# Altium PCB Story_machine V1.31.PcbDoc
Units mm, origin at the board's own origin, x right, y up, seen from the top; angles counter-clockwise.
Board outline 75 x 43 mm, 2 copper layers (Top Layer, Bottom Layer); 52 components, 47 nets, 209 pads, 177 vias.
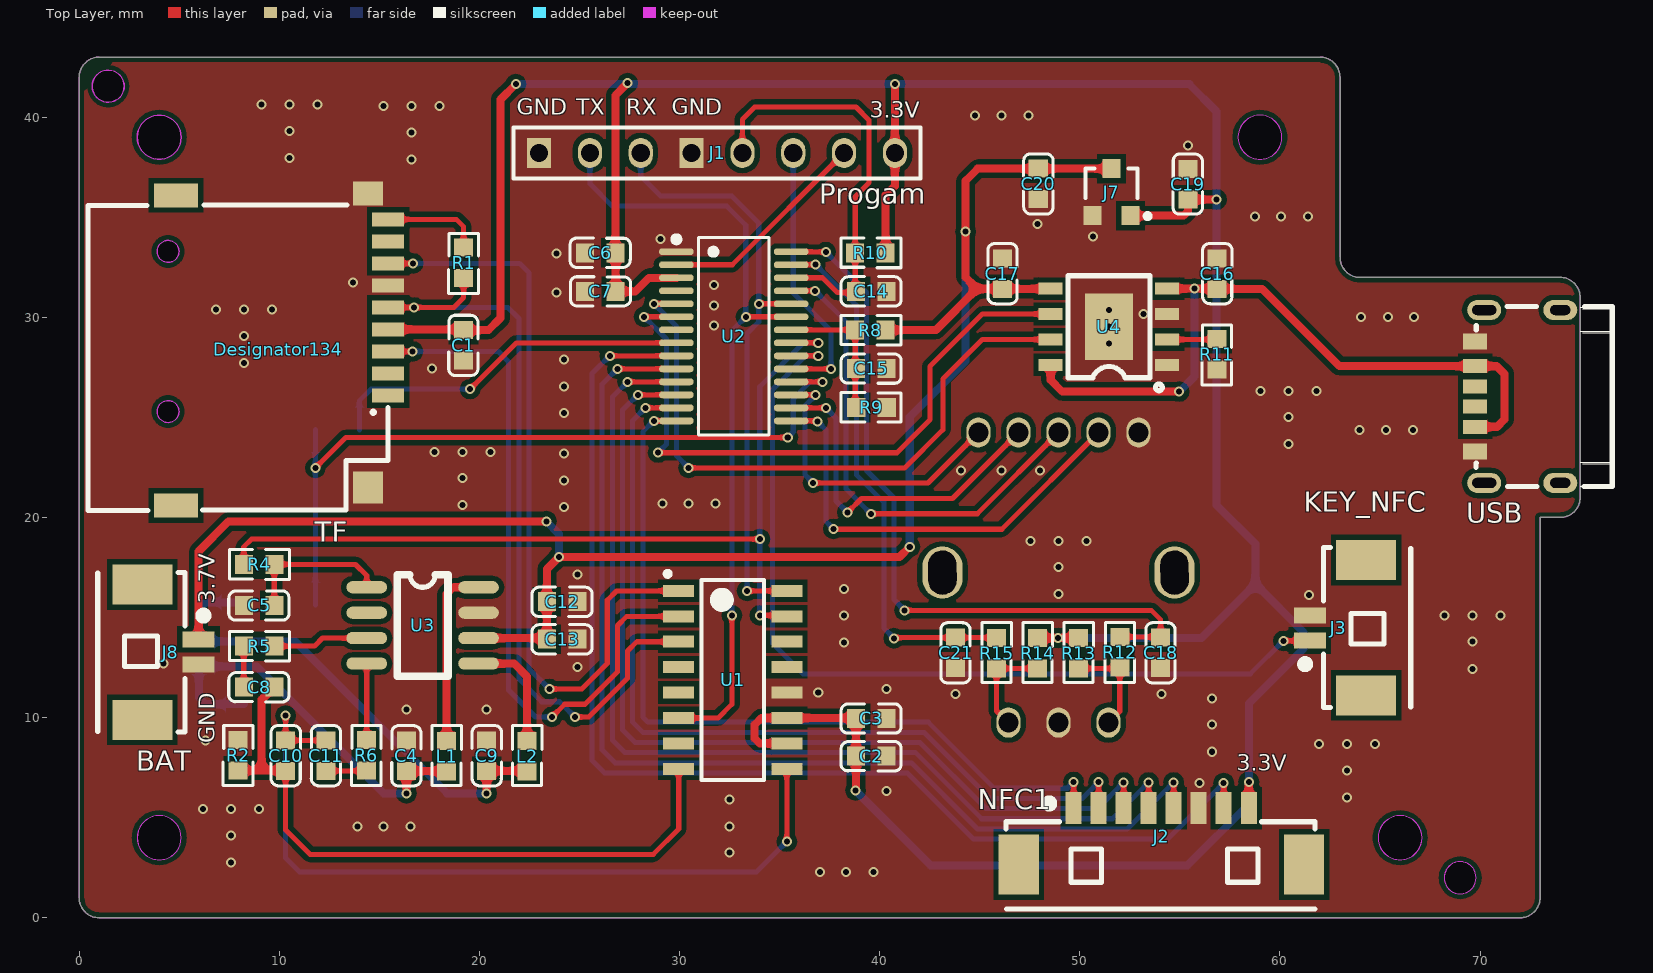
[diagram p0: Top Layer view]
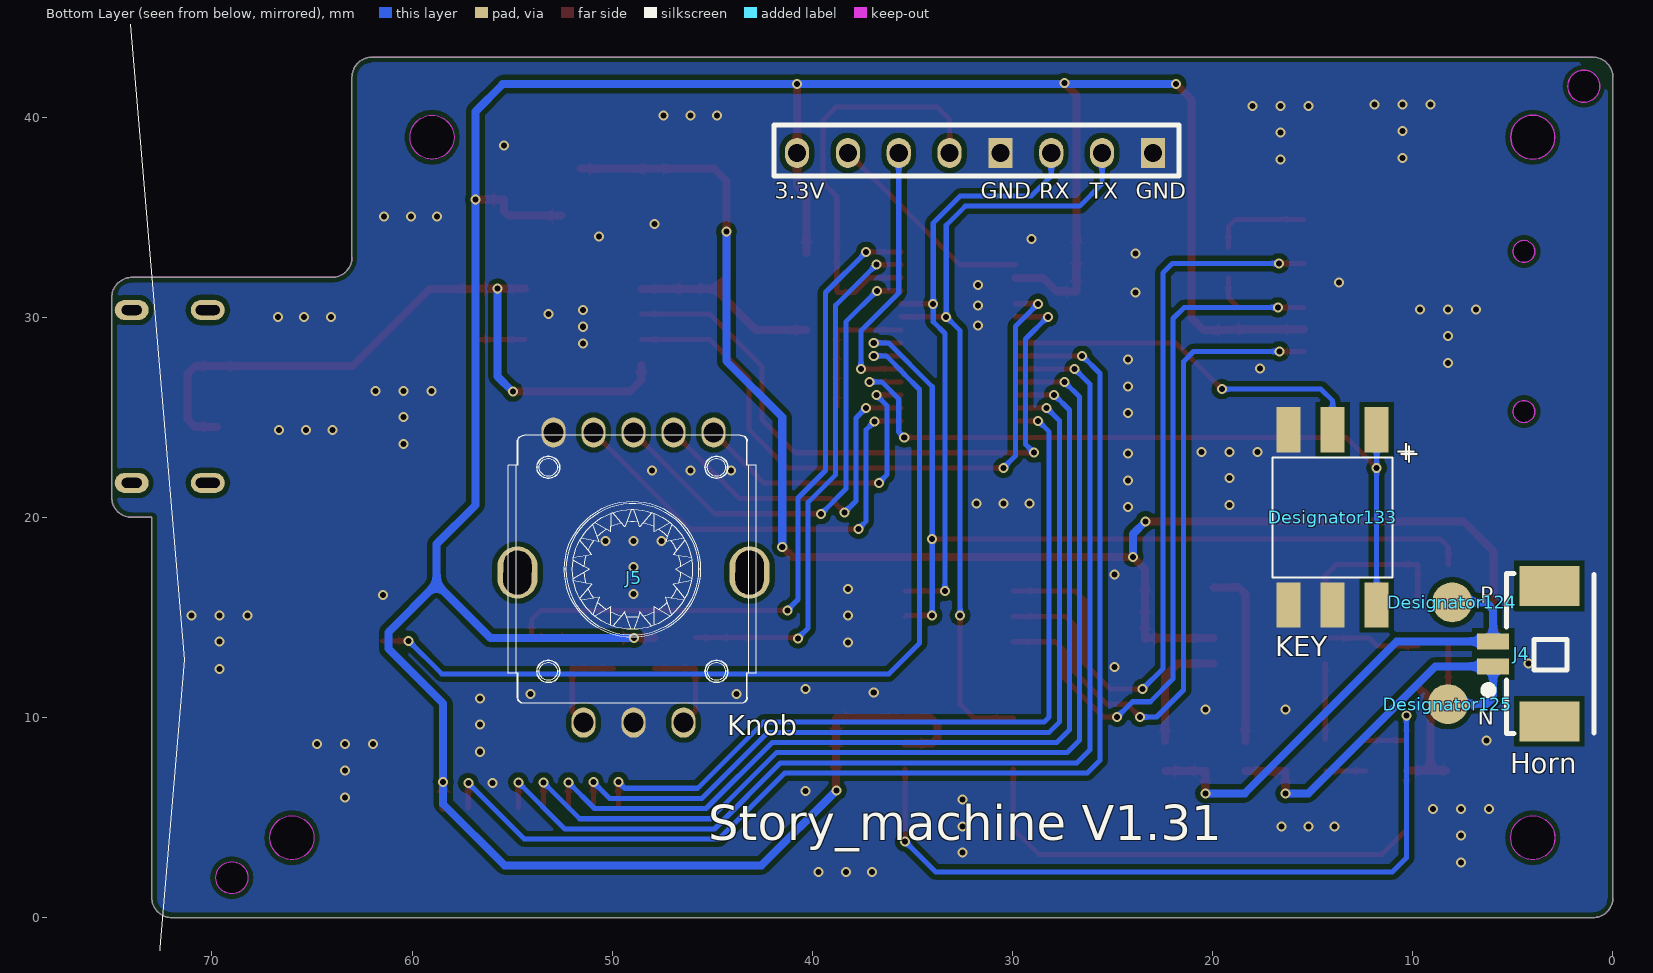
[diagram p1: Bottom Layer view, seen from below]
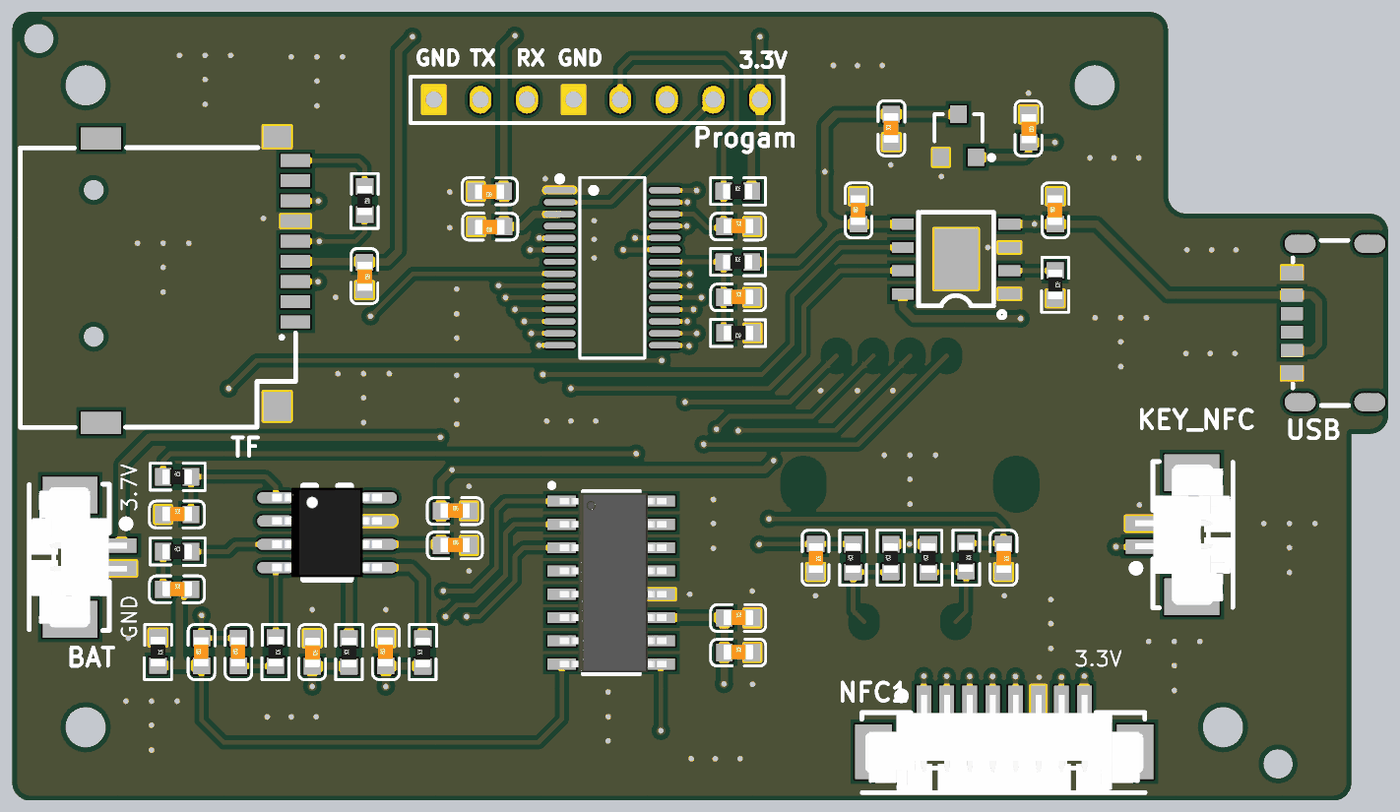
[diagram p2: 3D render of the assembled board from above, using the file's embedded part models]

## Layer stack, top to bottom
Top Solder: solder mask 0.0102, Solder Resist, Dk 3.5
Top Layer: signal copper 0.0356
Dielectric 1: dielectric 0.32, FR-4, Dk 4.8
Bottom Layer: signal copper 0.0356
Bottom Solder: solder mask 0.0102, Solder Resist, Dk 3.5

## Board outline
0,1 0,42 cw(c1,42) 1,43 62,43 cw(c62,42) 63,42 63,33 ccw(c64,33) 64,32 74,32 cw(c74,31) 75,31 75,21 cw(c74,21) 74,20 73,20 73,1 cw(c72,1) 72,0 1,0 cw(c1,1)
cut-out: 4.441,24.744 cw(c4.441,25.294) 3.891,25.294 cw(c4.441,25.294) 4.441,25.844 cw(c4.441,25.294) 4.991,25.294 cw(c4.441,25.294)
cut-out: 4.441,32.745 cw(c4.441,33.295) 3.891,33.295 cw(c4.441,33.295) 4.441,33.845 cw(c4.441,33.295) 4.991,33.295 cw(c4.441,33.295)
cut-out: 1.45,40.75 cw(c1.45,41.55) 0.65,41.55 cw(c1.45,41.55) 1.45,42.35 cw(c1.45,41.55) 2.25,41.55 cw(c1.45,41.55)
cut-out: 4,37.9 cw(c4,39) 2.9,39 cw(c4,39) 4,40.1 cw(c4,39) 5.1,39 cw(c4,39)
cut-out: 2.9,4 ccw(c4,4) 4,2.9 ccw(c4,4) 5.1,4 ccw(c4,4) 4,5.1 ccw(c4,4)
cut-out: 68.2,2 ccw(c69,2) 69,1.2 ccw(c69,2) 69.8,2 ccw(c69,2) 69,2.8 ccw(c69,2)
cut-out: 64.9,4 ccw(c66,4) 66,2.9 ccw(c66,4) 67.1,4 ccw(c66,4) 66,5.1 ccw(c66,4)
cut-out: 57.9,39 ccw(c59,39) 59,37.9 ccw(c59,39) 60.1,39 ccw(c59,39) 59,40.1 ccw(c59,39)

## Design rules (kind name [scope] priority, off if disabled: settings)
Clearance [All] p1: gap=0.254 ignorepadtopadclearanceinfootprint=FALSE except(0: Arc-Hole Track-Hole SMDPad-Hole THPad-Hole Via-Hole Fill-Hole Poly-Hole Region-Hole Text-Hole)
PolygonConnect [All] p1: connectstyle=Direct reliefconductorwidth=0.254 reliefentries=4 polygonreliefangle="90 Angle" airgapwidth=0.254
RoutingVias [All] p1: holewidth=0.711 width=1.27 viastyle="Through Hole" minholewidth=0.711 minwidth=1.27 maxholewidth=0.711 maxwidth=1.27
SolderMaskExpansion [All] p1: expansion=0.102
Width [All] p1: maxlimit=0.254 minlimit=0.254 preferedwidth=0.254
30 further rules are at their usual default settings.

## Classes and differential pairs
component class "Story_machine V1.0": C1 C3 C4 C5 C6 C7 C8 C9 C11 C12 C13 C14 C15 C16 C17 C18 C21 J1 J2 J3 J5 J8 KEY L1 L2 R1 R2 R4 R5 R6 R8 R9 R10 R11 R12 R13 R14 R15 SPK1 U1 U2 U3 U4 USB

## Components (designator, comment, footprint, x,y, rotation, side; value= is the part's Value field where it differs from the comment)
C1 "105" C-0603 19.203,28.595 r270 top value=106
C2 "106" C-0603 39.577,8.076 r0 top (schematic designator C3)
C3 "104" C-0603 39.577,9.96 r0 top
C4 "102" C-0603 16.355,8.088 r270 top
C5 "104" C-0603 8.986,15.607 r0 top
C6 "106" C-0603 26.026,33.221 r180 top
C7 "104" C-0603 26.044,31.292 r180 top
C8 "104" C-0603 8.986,11.525 r0 top
C9 "102" C-0603 20.362,8.103 r90 top
C10 "103" C-0603 10.316,8.103 r90 top (schematic designator C11)
C11 "104" C-0603 12.325,8.103 r90 top
C12 "106" C-0603 24.132,15.791 r0 top
C13 "104" C-0603 24.132,13.916 r0 top
C14 "106" C-0603 39.577,31.303 r0 top
C15 "104" C-0603 39.577,27.445 r0 top
C16 "106" C-0603 56.861,32.189 r90 top
C17 "106" C-0603 46.129,32.189 r90 top
C18 "104" C-0603 54.037,13.231 r270 top
C19 "105" C-0603 55.397,36.65 r270 top
C20 "105" C-0603 47.922,36.666 r90 top
C21 "104" C-0603 43.791,13.231 r270 top
Designator124 "Comment" TEXT_pro 10.242,20.976 r180 bottom
Designator125 "Comment" TEXT_pro 10.455,15.884 r180 bottom
Designator133 "KEY" key_LED 18.463,26.026 r270 bottom locked
Designator134 "Comment" TF-SMD_TF-PUSH 10.139,28.346 r270 top locked
J1 "Program" J8 31.396,34.695 r0 top
J2 "NFC1" "MX 1.25-WS-8P" 54.078,2.663 r0 top
J3 "KEY_NFC" "MX 1.25-WS-2P" 64.304,14.495 r90 top
J4 "Horn" "MX 1.25-WS-2P" 3.17,13.196 r90 bottom
J5 "Knob" KnoB_RGB 385.82,-257.576 r180 bottom locked
J7 "HL5933XR" SOT-23R 51.579,36.126 r0 top
J8 "BAT" "MX 1.25-WS-2P" 3.155,13.272 r270 top
L1 "80R" R-0603 18.361,8.076 r90 top
L2 "80R" R-0603 22.38,8.076 r90 top
R1 "1.5K" R-0603 19.21,32.721 r270 top
R2 "0" R-0603 7.944,8.126 r270 top
R4 "10K" R-0603 8.986,17.656 r0 top
R5 "1K" R-0603 8.986,13.573 r0 top
R6 "1K" R-0603 14.353,8.126 r270 top
R8 "100K" R-0603 39.539,29.365 r0 top
R9 "100K" R-0603 39.589,25.497 r180 top
R10 "10K" R-0603 39.539,33.224 r0 top
R11 "1.2K" R-0603 56.85,28.148 r270 top
R12 "10K" R-0603 51.995,13.27 r270 top
R13 "10K" R-0603 49.936,13.219 r90 top
R14 "10K" R-0603 47.887,13.219 r90 top
R15 "10K" R-0603 45.838,13.219 r90 top
U1 "WT2003H-16S*" SOP-16-1.27-6 32.657,11.886 r0 top locked
U2 "MS51EC0AE" MS51EC0AE 32.387,28.718 r270 top locked
U3 "WT8302" SOP-8-1.27-6 17.162,14.608 r0 top
U4 "TP4056" ESOP-8_L4.9-W3.9-P1.27-LS6.0-BL-EP 51.45,29.53 r90 top
USB "TYPE-C 6P" TYPE-C-SMD_TYPE-C-6P-073 74.039,26.427 r90 top (schematic designator USB1)

## Footprints (in the part's own frame and the unit in brackets; to place one, negate y for a bottom-side part, rotate by r counter-clockwise, add the part's x,y. Pads: shape width x height; smd on the part's side, far side on the other; paste and mask are expansions set on the pad)
C-0603 [mm] "元件 长X宽=60X30mil"
  rect 0.9x0.95 smd: 1(-0.762,0) 2(0.762,0)
  silkscreen extent -1.51,-0.74 1.5,0.73, body extent -0.79,-0.38 0.81,0.42, height 0.3
ESOP-8_L4.9-W3.9-P1.27-LS6.0-BL-EP [mm]
  rect 0.6x1.2 smd: 1(-1.905,-2.908) 2(-0.635,-2.908) 3(0.635,-2.908) 4(1.905,-2.908) 5(1.905,2.908) 6(0.635,2.908) 7(-0.635,2.908) 8(-1.905,2.908)
  rect 3.3x2.4 smd: 9(0,0)
  silkscreen extent -3.2,-2.67 2.55,2.05
J8 [mm]
  oval 1.2x1.5 hole 0.9: 1(9.364,3.522) 2(6.824,3.522) 3(4.284,3.522) 4(1.744,3.522) 6(-3.336,3.522) 7(-5.876,3.522)
  rect 1.2x1.5 hole 0.9: 5(-0.796,3.522) 8(-8.416,3.522)
  silkscreen extent -9.69,2.25 10.63,4.79
key_LED [mm] "带灯按键"
  rect 2.25x1.2 smd paste-100 mask+0.051: 1(1.643,6.664) 2(10.393,6.664) 3(1.643,4.464) 4(10.393,4.464) 5(1.643,2.264) 6(10.393,2.264)
  silkscreen extent 3.02,1.46 9.02,7.46
KnoB_RGB [mm] "三色LED  编码器带按压"
  oval 2x2.6 hole 2.2 slot 1.4 at 179.4 deg: 0(331.087,274.824) 0(342.687,274.824)
  oval 1.2x1.5 hole 1: 1(332.887,281.824) 2(334.887,281.824) 3(336.887,281.824) 4(338.887,281.824) 5(340.887,281.824) 6(334.387,267.324) 7(336.887,267.324) 8(339.387,267.324)
MS51EC0AE [mm]
  oval 0.343x1.731 smd: 1(-4.56,-2.545) 2(-3.91,-2.545) 3(-3.26,-2.545) 4(-2.61,-2.545) 5(-1.96,-2.545) 6(-1.31,-2.545) 7(-0.66,-2.545) 8(-0.01,-2.545) 9(0.64,-2.545) 10(1.29,-2.545) 11(1.94,-2.545) 12(2.59,-2.545) 13(3.24,-2.545) 14(3.89,-2.545) 15(3.89,3.187) 16(3.24,3.187) 17(2.59,3.187) 18(1.94,3.187) 19(1.29,3.187) 20(0.64,3.187) 21(-0.01,3.187) 22(-0.66,3.187) 23(-1.31,3.187) 24(-1.96,3.187) 25(-2.61,3.187) 26(-3.26,3.187) 27(-3.91,3.187) 28(-4.56,3.187)
  silkscreen extent -5.33,-2.69 4.59,2.09
"MX 1.25-WS-2P" [mm] "长：7.65mm，宽：4.2mm，高：3.4mm"
  rect 2x3 smd: 0(-3.382,0) 0(3.382,0)
  rect 0.8x1.6 smd: 1(-0.639,2.811) 2(0.611,2.811)
  silkscreen extent -3.98,-2.23 4,3.25, body extent -3.83,-2.1 3.83,3.09, height 3.4
"MX 1.25-WS-8P" [mm] "长：15.15mm，宽：4.2mm，高：3.4mm"
  rect 2x3 smd: 0(-7.132,0) 0(7.132,0)
  rect 0.8x1.6 smd: 1(-4.389,2.811) 2(-3.139,2.811) 3(-1.889,2.811) 4(-0.639,2.811) 5(0.611,2.811) 6(1.861,2.811) 7(3.111,2.811) 8(4.361,2.811)
  silkscreen extent -7.77,-2.23 7.67,3.25, body extent -7.57,-2.1 7.58,3.09, height 3.4
R-0603 [mm]
  rect 0.9x0.95 smd: 1(-0.762,0) 2(0.762,0)
  silkscreen extent -1.47,-0.75 1.52,0.74, body extent -0.8,-0.4 0.8,0.4, height 0.3
SOP-8-1.27-6 [mil] "焊盘间距1.27mm 芯片宽度6mm"
  oval 80x24 smd: 1(-110,75) 2(-110,25) 3(-110,-25) 4(-110,-75) 5(110,-75) 6(110,-25) 7(110,25) 8(110,75)
  silkscreen extent -50,-100 50,100, body extent -118,-96 118,97, height 61
SOP-16-1.27-6 [mm] "引脚间距1.27 芯片宽（包含引脚）6mm"
  rect 1.55x0.6 smd: 1(-2.7,4.445) 2(-2.7,3.175) 3(-2.7,1.905) 4(-2.7,0.635) 5(-2.7,-0.635) 6(-2.7,-1.905) 7(-2.7,-3.175) 8(-2.7,-4.445) 9(2.7,-4.445) 10(2.7,-3.175) 11(2.7,-1.905) 12(2.7,-0.635) 13(2.7,0.635) 14(2.7,1.905) 15(2.7,3.175) 16(2.7,4.445)
  silkscreen extent -3.37,-5 1.55,5.42, body extent -2.81,-4.9 2.99,4.9, height 1.75
SOT-23R [mm]
  rect 0.9x0.95 smd: 1(0.95,-1.048) 2(-0.95,-1.048) 3(0,1.302)
  silkscreen extent -1.3,-1.19 1.93,1.3
TEXT_pro [mm]
  round 2 smd: 0(2.218,-5.212)
TF-SMD_TF-PUSH [mm]
  rect 0.7x1.6 smd: 1(2.25,5.3) 2(1.15,5.3) 3(0.05,5.3) 4(-1.05,5.3) 5(-2.15,5.3) 6(-3.25,5.3) 7(-4.35,5.3) 8(-5.45,5.3) CD(-6.55,5.3)
  round 0 hole 1 paste+0 mask+0.102: 3(-4.95,-5.7) 3(3.05,-5.7)
  rect 1.2x1.5 smd: 10(-7.85,4.3)
  rect 1.2x2.2 smd: 11(-7.75,-5.3) 12(7.75,-5.3)
  rect 1.6x1.5 smd: 13(6.85,4.3)
  silkscreen extent -7.26,-9.7 8,5.3
TYPE-C-SMD_TYPE-C-6P-073 [mm]
  oval 1x1.7 hole 0.5 slot 1 at 90 deg: 7(-4.701,0.034) 7(3.939,0.034)
  oval 1x1.7 hole 0.5 slot 1.2 at 90 deg: 7(-4.701,3.834) 7(3.939,3.834)
  rect 0.7x1.2 smd paste-100 mask+0.051: A5(-0.881,4.284) A9(1.139,4.284) B5(0.119,4.284) B9(-1.901,4.284)
  rect 0.8x1.2 smd paste-100 mask+0.051: A12(2.369,4.284) B12(-3.131,4.284)
  silkscreen extent -4.88,-2.57 4.12,4.23

## Part data
C1: library part CAP, "无极性电容"
C2 C3 C4 C5 C6 C7 C8 C9 C10 C11 C12 C13 C14 C15 C16 C17 C18 C21: library part CAP, "Capacitor"
C19 C20: library part CAP1, "片状电容"
J1 J2 J5: library part CON8, "Connector"
J3 J4 J8: library part CON2, "Connector"
J7: library part CON3, "500ma 5Vת3.3V"
L1 L2: library part INDUCTOR1
R1 R4: library part R
R2: library part R, "不需要电阻，电池处连接"
R5: library part Res2, "Resistor", LatestRevisionDate=17-Jul-2002, LatestRevisionNote="Re-released for DXP Platform.", PackageReference=AXIAL-0.4, Published=8-Jun-2000, Publisher="Altium Limited"
R6 R11: library part RES2
R8 R9 R12 R13 R14 R15: library part RES2, "普通电阻"
R10: library part R, "普通电阻"
U1: library part WT2003H-16S_3, "WT2003H-16S"
U3: "5V2.9W功放"
U4: library part TP4056_C725790, "工作电压:3.7V~6.5V;最大充电电流:1A;电池类型:锂离子;电池节数:1;", Charge Current - Max=1A, Charging Saturation Voltage=4.2V, JLCPCB Part Class=扩?, Manufacturer=UMW(友?, Operating Temperature=-40℃~+85?, Voltage - Supply=3.7V~6.5V, Add into BOM=yes, Convert to PCB=yes, Datasheet=https://item.szlcsc.com/datasheet/TP4056/772193.html, Device=TP4056_C725790, LCSC Part Name=TP4056, Manufacturer Part=TP4056, Name=TP4056, Number of Cells=1, Supplier=LCSC, Supplier Footprint=ESOP-8, Supplier Part=C725790, Symbol=TP4056_C725790, The Chip Type=线?, Type of Battery=锂?
USB: library part TYPE-C

## Via types
v1: diameter 0.5, hole 0.3, Top Layer to Bottom Layer, tented both sides, 177 vias

## Nets (pads, with @x,y where several pads share a name; then routed paths per layer and width w, separated by ;. In a path a pad name is that pad's centre, name@x,y a point inside that pad or via, vN(x,y) a via of type N, cw(c..) or ccw(c..) an arc to the next point about the centre after c; other vN are vias at no path point)
3.3V: C1.1 C2.1 C3.1 C6.1 C7.1 C19.2 Designator134.4 J1.1 J2.8 J7.1 R10.2 R13.2 R14.2 U1.10 U1.11 U2.3 | length 166.2
  Top Layer w0.4: Designator134.4 C1.1@19.164,29.396 ; C1.1 20.443,29.357 21.054,29.967 21.054,40.889 v1(21.816,41.651) ; C6.1@26.788,32.952 C6.1 26.788,41.089 v1(27.404,41.706) ; C6.1@26.806,32.933 C7.1 27.785,31.292 28.471,31.978 U2.3 ; U1.10 34.008,8.711 33.754,8.965 33.754,9.647 34.088,9.981 U1.11 ; U1.11@35.611,9.981 C3.1@38.794,9.981 ; v1@38.815,6.382 C2.1 C3.1 ; R10.2 40.301,36.112 40.76,36.571 J1.1 v1(40.76,41.651) ; R14.2 v1(48.911,13.981) R13.2 ; J7.1 55.174,35.078 55.397,35.301 C19.2 v1(56.835,35.888) ; J2.8 v1(58.44,6.787)
  Bottom Layer w0.4: v1(21.816,41.651) v1(40.76,41.651) 55.471,41.651 56.835,40.287 v1(56.835,35.888) 56.835,20.615 58.773,18.677 58.773,16.672 ; v1(38.795,6.362) 42.536,2.621 55.386,2.621 58.44,5.675 v1(58.44,6.787) 58.44,10.7 61.186,13.446 61.186,14.259 58.773,16.672 ; v1(48.911,13.981) 56.082,13.981 58.773,16.672
0316AGND: C8.2 C10.1 R2.2 U1.8 | length 33
  Top Layer w0.254: 9.116,7.341 9.116,7.364 ; C10.1 10.316,4.385 11.53,3.17 28.687,3.17 29.957,4.44 U1.8
  Top Layer w0.4: R2.2@8.325,7.364 9.116,7.364 ; C8.2 9.116,10.893 9.116,7.364 ; C10.1@10.293,7.364 9.116,7.364
0316BUSY: R4.1 U1.15 U2.21 | length 44.8
  Top Layer w0.254: R4.1 8.224,18.534 8.608,18.918 v1(34.008,18.918) ; v1(34.008,15.108) 35.31,15.108 U1.15 ; U2.21 v1(36.929,28.728)
  Bottom Layer w0.254: v1(34.008,15.108) v1(34.008,18.918) 34.008,26.538 36.197,28.728 v1(36.929,28.728)
0316DAC1: C10.2 C11.2 U1.9 | length 40
  Top Layer w0.254: v1(10.316,10.098) C10.2 C11.2 ; v1(35.357,3.805) U1.9
  Bottom Layer w0.254: v1(10.316,10.098) 10.316,2.986 11.021,2.281 33.833,2.281 v1(35.357,3.805)
+5V-USB: C16.1 U4.4 U4.8 USB.A9 USB.B9 | length 35.4
  Top Layer w0.4: U4.8 48.541,26.864 49.121,26.284 v1(54.963,26.284) ; U4.4 v1(55.725,31.435) C16.1@56.853,31.435 ; C16.1 59.103,31.427 62.964,27.566 USB.A9 70.826,27.566 71.219,27.173 71.219,24.907 70.838,24.526 USB.B9
  Bottom Layer w0.4: v1(54.963,26.284) 55.725,27.046 v1(55.725,31.435)
ADC_CH11: C15.1 R8.1 R9.2 U2.22 | length 7
  Top Layer w0.254: U2.22 R8.1@38.764,29.378 ; R9.2@38.777,25.548 R8.1
BAT: C12.1 C13.1 C17.1 C20.2 J7.3 J8.1 R8.2 U3.6 U4.5 | length 89
  Top Layer w0.4: J8.1 5.965,18.308 7.469,19.811 v1(23.34,19.811) ; U3.6 23.314,13.973 C13.1@23.37,14.029 ; C13.1 C13.1@23.37,14.029 ; R8.2 42.805,29.365 44.867,31.427 ; v1(41.501,18.537) 40.993,18.029 v1(23.975,18.029) 23.37,17.424 C12.1 C13.1@23.37,14.029 ; U4.5@48.533,31.427 C17.1 44.867,31.427 ; J7.3 C20.2 44.897,37.428 44.295,36.825 v1(44.295,34.285) 44.295,31.999 44.867,31.427
  Bottom Layer w0.4: v1(23.34,19.811) 23.975,19.176 v1(23.975,18.029) ; v1@41.501,18.664 41.501,25.014 44.295,27.808 v1(44.295,34.285)
CHRG: U2.5 U4.7 | length 32.3
  Top Layer w0.254: v1(28.725,30.678) U2.5 ; v1(30.452,22.474) 41.247,22.474 43.152,24.379 43.152,26.919 45.128,28.895 U4.7
  Bottom Layer w0.254: v1(28.725,30.678) 29.855,29.548 29.855,23.071 v1(30.452,22.474)
CLK: Designator134.5 R1.2 U1.3 | length 39.5
  Top Layer w0.254: Designator134.5 v1(16.736,30.496) 18.715,30.496 19.21,30.991 R1.2 ; v1(24.765,10.033) 25.462,10.033 27.397,11.968 27.397,13.323 27.865,13.791 U1.3
  Bottom Layer w0.254: v1(16.736,30.496) 21.414,30.496 21.971,29.939 21.971,11.938 23.114,10.795 24.003,10.795 v1(24.765,10.033)
CS: Designator134.7 U1.1 | length 38.8
  Top Layer w0.254: Designator134.7 v1(16.687,32.696) ; v1(23.495,11.43) 25.115,11.43 26.388,12.703 26.388,15.87 26.849,16.331 U1.1
  Bottom Layer w0.254: v1(16.687,32.696) 22.008,32.696 22.479,32.225 22.479,12.446 v1(23.495,11.43)
DAT: Designator134.3@15.439,28.296 U1.2 | length 35.1
  Top Layer w0.254: Designator134.3@15.439,28.296 v1(16.667,28.296) ; v1(23.622,10.033) 24.257,10.668 25.278,10.668 26.896,12.286 26.896,14.6 27.357,15.061 U1.2
  Bottom Layer w0.254: v1(16.667,28.296) 20.947,28.296 21.455,27.788 21.455,11.374 22.796,10.033 v1(23.622,10.033)
GND: C1.2 C2.2 C3.2 C4.1 C5.1 C6.2 C7.2 C9.2 C12.2 C13.2 C14.2 C15.2 C16.2 C17.2 C18.2 C19.1 C20.1 C21.2 Designator133.4 Designator133.5 Designator133.6 Designator134.6 Designator134.10 Designator134.13 J1.5 J1.8 J2.6 J3.2 J5.1 J5.7 J7.2 J8.2 R2.1 R9.1 R11.2 U1.12 U2.1 U3.7 U4.1 U4.3 U4.9 USB.A12 USB.B12
  other v1: 37.011,2.281 38.326,2.281 39.678,2.281 7.592,2.756 32.484,3.253 7.592,4.108 13.897,4.567 15.212,4.567 16.564,4.567 32.484,4.567 6.195,5.423 7.592,5.423 8.989,5.423 32.484,5.92 63.345,6.009 40.351,6.345 55.979,6.728 63.345,7.361 56.614,8.295 61.948,8.676 63.345,8.676 64.742,8.676 6.322,8.85 56.614,9.647 16.355,10.409 20.362,10.409 56.614,10.962 43.787,11.171 54.074,11.171 36.929,11.251 40.339,11.425 69.621,12.439 24.894,12.521 4.215,12.703 38.22,13.756 69.621,13.791 68.224,15.106 69.621,15.106 71.018,15.106 38.22,15.108 61.44,16.124 48.933,16.169 38.22,16.423 24.894,17.14 48.933,17.521 47.536,18.836 48.933,18.836 50.33,18.836 24.229,20.525 19.149,20.614 29.137,20.696 30.452,20.696 31.804,20.696 24.229,21.839 19.149,21.966 44.069,22.352 46.073,22.352 48.006,22.352 24.229,23.192 17.752,23.281 19.149,23.281 20.546,23.281 60.424,23.662 63.984,24.379 65.299,24.379 66.651,24.379 60.424,25.014 24.229,25.224 59.027,26.329 60.424,26.329 61.821,26.329 24.229,26.538 17.625,27.445 8.227,27.726 24.229,27.891 51.45,28.697 8.227,29.078 51.45,29.53 31.722,29.586 64.036,30.028 65.389,30.028 66.703,30.028 53.185,30.165 51.45,30.366 6.83,30.393 8.227,30.393 9.624,30.393 31.722,30.602 23.848,31.237 31.722,31.618 13.688,31.745 23.848,33.185 29.055,33.904 50.645,34.031 47.887,34.666 58.743,35.047 60.058,35.047 61.41,35.047 16.609,37.886 10.513,37.968 55.397,38.579 16.609,39.238 10.513,39.321 44.758,40.079 46.073,40.079 47.425,40.079 15.212,40.553 16.609,40.553 18.006,40.553 9.116,40.635 10.513,40.635 11.91,40.635
KEY_Inter: Designator133.1 Designator133.2 U2.18 | length 38.4
  Top Layer w0.254: v1(11.799,22.474) 13.323,23.998 v1(35.405,23.998) ; U2.18 v1(37.14,26.778)
  Bottom Layer w0.254: Designator133.2 v1(11.799,22.474) Designator133.1 ; v1(35.405,23.998) 35.68,24.273 35.68,25.924 36.533,26.778 v1(37.14,26.778)
KEY_Knob: J5.3 U2.25 | length 24.6
  Top Layer w0.254: U2.25 v1(36.771,31.328) ; v1@39.574,20.188 44.873,20.188 J5.3
  Bottom Layer w0.254: v1(36.771,31.328) 38.322,29.777 38.322,21.419 v1(39.574,20.166)
KEY_Knob_A: C18.1 R12.1 U2.28 | length 37.2
  Top Layer w0.254: U2.28 35.81,33.278 35.819,33.269 v1(37.31,33.269) ; v1(41.247,15.362) 53.566,15.362 54.037,14.892 C18.1 ; R12.1 C18.1@53.998,14.032
  Bottom Layer w0.254: v1(37.31,33.269) 39.342,31.237 39.342,22.347 40.713,20.976 40.713,15.896 v1(41.247,15.362)
KEY_Knob_A_In: J5.6 R12.2 R13.1 | length 5
  Top Layer w0.254: R13.1 R12.2@51.944,12.457 ; J5.6 51.995,10.31 R12.2
KEY_Knob_B: C21.1 R15.2 U2.27 | length 26.6
  Top Layer w0.254: U2.27 35.58,32.634 v1(36.802,32.634) ; v1@40.713,13.993 C21.1 R15.2@45.826,13.993
  Bottom Layer w0.254: v1(36.802,32.634) 38.83,30.606 38.83,22.322 38.834,22.318 38.834,22.137 40.205,20.766 40.205,14.473 v1(40.713,13.965)
KEY_Knob_B_In: J5.8 R14.1 R15.1 | length 5
  Top Layer w0.254: J5.8 45.838,10.344 R15.1 R14.1
KEY_NFC: J3.1 U2.20 | length 45.2
  Top Layer w0.254: U2.20 v1(36.929,28.078) ; v1(60.17,13.838) J3.1@61.476,13.838
  Bottom Layer w0.254: v1(36.929,28.078) 36.309,28.078 35.405,27.174 35.405,27.159 34.643,26.397 34.643,13.711 36.167,12.187 58.519,12.187 v1(60.17,13.838)
LED_B: J5.2 U2.15 | length 22.2
  Top Layer w0.254: U2.15 v1@36.861,24.828 ; v1@37.691,19.411 46.096,19.411 J5.2
  Bottom Layer w0.254: v1(36.895,24.794) 37.306,24.383 37.306,19.811 v1(37.691,19.426)
LED_G: J5.4 U2.16 | length 17.5
  Top Layer w0.254: U2.16 v1(37.31,25.478) ; v1@38.453,20.315 39.088,20.95 43.635,20.95 J5.4
  Bottom Layer w0.254: v1(37.31,25.478) 37.814,24.974 37.814,21.208 37.818,21.204 37.818,20.823 v1(38.389,20.252)
LED_KEY: Designator133.3 U2.8 | length 18.5
  Top Layer w0.254: v1(19.53,26.411) 21.846,28.728 U2.8
  Bottom Layer w0.254: Designator133.3 13.999,25.834 14.577,26.411 v1(19.53,26.411)
LED_R: J5.5 U2.17 | length 15.3
  Top Layer w0.254: U2.17 v1(36.802,26.128) ; v1(36.675,21.726) 42.411,21.726 J5.5
  Bottom Layer w0.254: v1(36.675,21.726) 36.262,22.139 36.262,25.588 v1(36.802,26.128)
LOUT_N: C4.2 Designator125.0 J4.1 L1.1 | length 20
  Top Layer w0.4: v1(16.355,6.218) C4.2 L1.1@18.349,7.326
  Bottom Layer w0.4: Designator125.0 6.313,10.672 5.98,11.005 J4.1 8.873,12.557 15.212,6.218 v1(16.355,6.218)
LOUT_P: C9.1 Designator124.0 J4.2 L2.1 | length 24.4
  Top Layer w0.4: v1(20.362,6.218) C9.1 L2.1@22.352,7.341
  Bottom Layer w0.4: Designator124.0 6.342,15.764 5.98,15.402 J4.2 10.798,13.807 18.387,6.218 v1(20.362,6.218)
NetC5_2: C5.2 R4.2 U3.1 | length 7.5
  Top Layer w0.254: C5.2 R4.2 13.808,17.656 14.368,17.096 U3.1
NetC8_1: C8.1 R5.1 | length 2
  Top Layer w0.254: C8.1 R5.1
NetC11_1: C11.1 R6.2 | length 2
  Top Layer w0.254: C11.1 R6.2@14.329,7.341
NetCARD1_CD: Designator134.CD R1.1 | length 5
  Top Layer w0.254: Designator134.CD 18.846,34.896 19.21,34.532 R1.1
NetL1_2: L1.2 U3.8 | length 9.1
  Top Layer w0.4: L1.2 18.361,16.179 18.695,16.513 U3.8
NetL2_2: L2.2 U3.5 | length 5.9
  Top Layer w0.4: U3.5 21.737,12.703 22.38,12.06 L2.2
NetR5_2: R5.2 U3.3 | length 4.8
  Top Layer w0.254: R5.2 11.765,13.573 12.164,13.973 U3.3
NetR6_1: R6.1 U3.4 | length 3.8
  Top Layer w0.254: R6.1@14.368,8.903 U3.4
NetR11_1: R11.1 U4.2 | length 2.5
  Top Layer w0.254: U4.2 R11.1@56.835,28.895
Program_CLK: J1.3 U2.19 | length 13.6
  Top Layer w0.254: U2.19@35.574,27.428 v1(37.564,27.428)
  Bottom Layer w0.254: J1.3 35.68,31.216 37.564,29.332 v1(37.564,27.428)
Program_DAT: J1.2 U2.2 | length 10.7
  Top Layer w0.254: U2.2 32.631,32.628 J1.2
Program_RST: C14.1 J1.4 R10.1 U2.26 | length 20.8
  Top Layer w0.254: J1.4 33.14,39.894 33.754,40.508 38.815,40.508 39.469,39.854 39.469,36.731 38.777,36.039 R10.1 C14.1@38.777,31.342 ; U2.26 37.14,31.978 37.881,31.237 C14.1@38.749,31.237
RC522_IRQ: J2.5 U2.10 | length 54.8
  Top Layer w0.254: v1(26.896,27.428) U2.10 ; J2.5 v1(54.69,6.768)
  Bottom Layer w0.254: v1(26.896,27.428) 26.134,26.666 26.134,8.377 26.769,7.742 41.584,7.742 44.886,4.44 52.362,4.44 v1(54.69,6.768)
RC522_RST: J2.7 U2.9 | length 59.5
  Top Layer w0.254: v1(26.515,28.078) U2.9 ; J2.7 v1(57.19,6.728)
  Bottom Layer w0.254: v1(26.515,28.078) 25.626,27.189 25.626,7.869 26.261,7.234 41.374,7.234 44.676,3.932 54.394,3.932 v1(57.19,6.728)
RC522_SCK: J2.2 U2.13 | length 44
  Top Layer w0.254: v1(28.293,25.478) U2.13 ; J2.2 v1(50.94,6.78)
  Bottom Layer w0.254: v1(28.293,25.478) 27.658,24.843 27.658,9.774 28.166,9.266 42.216,9.266 45.518,5.964 50.124,5.964 v1(50.94,6.78)
RC522_SDA1: J2.1 U2.14 | length 40.6
  Top Layer w0.254: v1(28.716,24.828) U2.14 ; J2.1 v1(49.69,6.787)
  Bottom Layer w0.254: v1(28.716,24.828) 28.166,24.277 28.166,10.028 28.42,9.774 42.426,9.774 45.728,6.472 49.375,6.472 v1(49.69,6.787)
RC522_SI: J2.3 U2.12 | length 47.5
  Top Layer w0.254: v1(27.912,26.128) U2.12 ; J2.3 v1(52.19,6.766)
  Bottom Layer w0.254: v1(27.912,26.128) 27.15,25.366 27.15,9.393 27.785,8.758 42.005,8.758 45.307,5.456 50.88,5.456 v1(52.19,6.766)
RC522_SO: J2.4 U2.11 | length 51.1
  Top Layer w0.254: v1(27.404,26.778) U2.11 ; J2.4 v1(53.44,6.765)
  Bottom Layer w0.254: v1(27.404,26.778) 26.642,26.016 26.642,8.885 27.277,8.25 41.795,8.25 45.097,4.948 51.622,4.948 v1(53.44,6.765)
RX: J1.6 U1.16 U2.24 | length 30.3
  Top Layer w0.254: v1(33.373,16.331) U1.16 ; v1(33.957,30.678) U2.24
  Bottom Layer w0.254: J1.6 28.06,37.058 29.055,36.063 32.611,36.063 33.957,34.717 v1(33.957,30.678) 33.957,29.781 33.373,29.198 v1(33.373,16.331)
STDBY: U2.6 U4.6 | length 33.1
  Top Layer w0.254: v1(28.232,30.028) U2.6 ; v1(28.928,23.236) 40.866,23.236 42.517,24.887 42.517,27.554 45.128,30.165 U4.6
  Bottom Layer w0.254: v1(28.232,30.028) 29.347,28.913 29.347,23.656 v1(28.928,23.236)
TX: J1.7 U1.6 U2.23 | length 39.6
  Top Layer w0.254: U1.6 31.929,9.981 32.611,10.663 v1(32.611,15.108) ; v1(33.307,30.028) U2.23
  Bottom Layer w0.254: J1.7 25.52,36.677 26.642,35.555 32.357,35.555 33.307,34.605 v1(33.307,30.028) 32.611,29.332 v1(32.611,15.108)
Vout: 
pads on no net: Designator134.1 Designator134.2 Designator134.3@4.439,25.296 Designator134.3@4.439,33.296 Designator134.8 Designator134.11 Designator134.12 J2.0 J3.0 J4.0 J5.0 J8.0 U1.4 U1.5 U1.7 U1.13 U1.14 U2.4 U2.7 U3.2 USB.7 USB.A5 USB.B5

## Polygon pours and split planes (outlines as drawn)
GND on Bottom Layer "GND_L02_P008" (solid, remove dead copper, pour order 8): 0,1 0,42 cw(c1,42) 1,43 62,43 cw(c62,42) 63,42 63,33 ccw(c64,33) 64,32 74,32 cw(c74,31) 75,31 75,21 cw(c74,21) 74,20 73,20 73,1 cw(c72,1) 72,0 1,0 cw(c1,1)
GND on Top Layer "GND_L01_P007" (solid, remove dead copper, pour order 7): 0,1 0,42 cw(c1,42) 1,43 62,43 cw(c62,42) 63,42 63,33 ccw(c64,33) 64,32 74,32 cw(c74,31) 75,31 75,21 cw(c74,21) 74,20 73,20 73,1 cw(c72,1) 72,0 1,0 cw(c1,1)

## Keep-outs
Keep-Out Layer:
  circle w0.013: c4.441,25.294 r0.55
  circle w0.013: c4.441,33.295 r0.55
  circle w0.013: c4,4 r1.1
  circle w0.013: c66,4 r1.1
  circle w0.013: c59,39 r1.1
  circle w0.013: c1.45,41.55 r0.8
  circle w0.013: c4,39 r1.1
  circle w0.013: c69,2 r0.8
  lines w0.013: 0,1 ccw(c1,1) 1,0 72,0 ccw(c72,1) 73,1 73,20 74,20 ccw(c74,21) 75,21 75,31 ccw(c74,31) 74,32 64,32 cw(c64,33) 63,33 63,42 ccw(c62,42) 62,43 1,43 ccw(c1,42) 0,42 0,1

## Silkscreen, mask and mechanical layers (free items; w line width, h text height)
Top Overlay:
  lines w0.013: 75,21.56 76.5,21.56 76.5,22.76 ; 75,22.76 76.5,22.76 ; 75,29.3 76.5,29.3 ; 75,30.5 76.5,30.5 76.5,29.3 ; 75.131,21.492 76.631,21.492 76.631,22.692 ; 75.131,22.692 76.631,22.692 ; 75.131,29.232 76.631,29.232 ; 75.131,30.432 76.631,30.432 76.631,29.232 ; 76.5,22.76 76.5,29.3 ; 76.631,22.692 76.631,29.232
  text "GND" at 21.855,40.112 h0.8
  text "TX" at 24.833,40.112 h0.8
  text "RX" at 27.33,40.112 h0.8
  text "GND" at 29.602,40.112 h0.8
  text "3.3V" at 39.508,39.985 h0.8
  text "Progam" at 36.981,35.679 h1
  text "TF" at 11.783,18.791 h1
  text "3.7V" at 6.764,15.701 h0.8 r90
  text "GND" at 6.764,8.716 h0.8 r90
  text "3.3V" at 57.841,7.347 h0.8
Bottom Overlay:
  drawing of 202 lines, arcs and shapes, not listed
  text "GND" at 23.841,35.921 h0.8
  text "TX" at 26.127,35.921 h0.8
  text "RX" at 28.667,35.921 h0.8
  text "GND" at 31.588,35.921 h0.8
  text "3.3V" at 41.875,35.921 h0.8
  text "+" at 9.751,22.855 h1
  text "P" at 6.619,15.728 h0.8
  text "KEY" at 16.856,13.061 h1
  text "N" at 6.756,9.632 h0.8
  text "Story_machine V1.31" at 45.205,3.287 h3
Mechanical 22:
  drawing of 175 lines, arcs and shapes, not listed
  text "料号" at 135.082,452.539 h2.43
  text "38" at 278.329,448.476 h3.5
  text "件数" at 134.87,444.562 h2.43
  text "料号" at 106.888,431.584 h2.43
  text "件数" at 106.676,423.607 h2.43
  text "50" at 258.1,420.772 h3.5 r90
  text "70" at 362.394,373.165 h3.5
  text "70" at 275.858,362.883 h3.5
  text "70" at 213.538,361.064 h3.5
  text "40" at 250.988,338.5 h3.5 r90
  text "30" at 267.18,329.551 h3.5 r90
  text "技术要求" at 440.989,241.009 h2.38
  text "1：外观光洁平整，去除毛刺、锐边，无变形等缺陷；" at 440.989,236.334 h2.38
  text "2：未注公差均按GB/T 1804-2000-M和GB/T 1184-1996-L精度制作；" at 440.989,231.659 h2.38
  text "3：本件的焊接应符合ISO 5817-2014中C级的规定，接缝处满焊。" at 440.989,226.984 h2.38
  text "3：喷涂颜色与图纸要求或样件及色板一致；" at 440.989,222.309 h2.38
  text "技术要求" at 412.795,220.054 h2.38
  text "4：喷涂前必须经过酸洗和磷化处理，无挂滴、条纹、起泡、桔皮、剥" at 440.989,217.634 h2.38
  text "1：外观光洁平整，去除毛刺、锐边，无变形等缺陷；" at 412.795,215.379 h2.38
  text "落、划伤等缺陷，附着力性能可靠；" at 443.668,212.959 h2.38
  text "2：未注公差均按GB/T 1804-2000-M和GB/T 1184-1996-L精度制作；" at 412.795,210.704 h2.38
  text "3：本件的焊接应符合ISO 5817-2014中C级的规定，接缝处满焊。" at 412.795,206.029 h2.38
  text "3：喷涂颜色与图纸要求或样件及色板一致；" at 412.795,201.354 h2.38
  text "喷塑" at 341.895,199.743 h3.5
  text "表面处理" at 324.72,198.96 h2.43
  text "批准" at 391.423,198.772 h2.43
  text "材料" at 433.914,198.772 h2.43
  text "图号" at 477.523,198.732 h2.43
  text "图幅" at 520.437,198.38 h2.43
  text "A3" at 533.154,198.38 h2.43
  text "4：喷涂前必须经过酸洗和磷化处理，无挂滴、条纹、起泡、桔皮、剥" at 412.795,196.679 h2.38
  text "落、划伤等缺陷，附着力性能可靠；" at 415.474,192.004 h2.38
  text "kg" at 528.883,191.471 h3.4
  text "工程号" at 434.028,190.456 h2.43
  text "子项号" at 477.559,190.456 h2.43
  text "单重" at 520.437,190.338 h2.43
  text "版次" at 324.771,190.268 h2.43
  text "1" at 361.677,190.268 h2.43
  text "审核" at 391.423,190.268 h2.43
  text "1:2" at 530.894,182.567 h3.4
  text "日期" at 324.771,181.765 h2.43
  text "校核" at 391.423,181.715 h2.43
  text "项目名称" at 434.089,181.627 h2.43
  text "比例" at 520.437,181.434 h2.43
  text "喷塑" at 313.701,178.788 h3.5
  text "表面处理" at 296.526,178.005 h2.43
  text "批准" at 363.229,177.817 h2.43
  text "材料" at 405.72,177.817 h2.43
  text "图号" at 449.329,177.777 h2.43
  text "图幅" at 492.243,177.425 h2.43
  text "A3" at 504.96,177.425 h2.43
  text "小积木-1" at 444.71,174.997 h3.4
  text "状态" at 324.771,173.885 h2.43
  text "修改        说明" at 360.352,173.885 h2.43
  text "ﾉ霈ﾆ" at 391.423,173.885 h2.43
  text "图纸名称" at 434.089,173.864 h2.43
  text "kg" at 500.689,170.516 h3.4
  text "工程号" at 405.834,169.501 h2.43
  text "子项号" at 449.365,169.501 h2.43
  text "单重" at 492.243,169.383 h2.43
  text "版次" at 296.577,169.313 h2.43
  text "1" at 333.483,169.313 h2.43
  text "审核" at 363.229,169.313 h2.43
  text "1:2" at 502.7,161.612 h3.4
  text "日期" at 296.577,160.81 h2.43
  text "校核" at 363.229,160.76 h2.43
  text "项目名称" at 405.895,160.672 h2.43
  text "比例" at 492.243,160.479 h2.43
  text "故事机" at 416.516,154.042 h3.4
  text "状态" at 296.577,152.93 h2.43
  text "修改        说明" at 332.158,152.93 h2.43
  text "ﾉ霈ﾆ" at 363.229,152.93 h2.43
  text "图纸名称" at 405.895,152.909 h2.43

## Text inside footprints (layer, text, board x,y; h text height)
C1: Mechanical 15 "1" at 18.858,28.721 h0.58 r270
C2: Mechanical 15 "1" at 39.451,7.731 h0.58
C3: Mechanical 15 "1" at 39.451,9.615 h0.58
C4: Mechanical 15 "1" at 16.01,8.214 h0.58 r270
C5: Mechanical 15 "1" at 8.86,15.262 h0.58
C6: Mechanical 15 "1" at 26.152,33.566 h0.58 r180
C7: Mechanical 15 "1" at 26.17,31.637 h0.58 r180
C8: Mechanical 15 "1" at 8.86,11.18 h0.58
C9: Mechanical 15 "1" at 20.707,7.977 h0.58 r90
C10: Mechanical 15 "1" at 10.661,7.977 h0.58 r90
C11: Mechanical 15 "1" at 12.67,7.977 h0.58 r90
C12: Mechanical 15 "1" at 24.006,15.446 h0.58
C13: Mechanical 15 "1" at 24.006,13.572 h0.58
C14: Mechanical 15 "1" at 39.451,30.958 h0.58
C15: Mechanical 15 "1" at 39.451,27.1 h0.58
C16: Mechanical 15 "1" at 57.206,32.063 h0.58 r90
C17: Mechanical 15 "1" at 46.474,32.063 h0.58 r90
C18: Mechanical 15 "1" at 53.692,13.357 h0.58 r270
C19: Mechanical 15 "1" at 55.052,36.776 h0.58 r270
C20: Mechanical 15 "1" at 48.267,36.54 h0.58 r90
C21: Mechanical 15 "1" at 43.446,13.357 h0.58 r270
Designator133: Bottom Overlay "+" at 10.589,23.74 h1 r90
L1: Mechanical 15 "1" at 18.706,7.95 h0.58 r90
L2: Mechanical 15 "1" at 22.725,7.95 h0.58 r90
R1: Mechanical 15 "1" at 18.865,32.847 h0.58 r270
R2: Mechanical 15 "1" at 7.599,8.252 h0.58 r270
R4: Mechanical 15 "1" at 8.86,17.311 h0.58
R5: Mechanical 15 "1" at 8.86,13.229 h0.58
R6: Mechanical 15 "1" at 14.008,8.252 h0.58 r270
R8: Mechanical 15 "1" at 39.413,29.021 h0.58
R9: Mechanical 15 "1" at 39.715,25.842 h0.58 r180
R10: Mechanical 15 "1" at 39.413,32.879 h0.58
R11: Mechanical 15 "1" at 56.505,28.274 h0.58 r270
R12: Mechanical 15 "1" at 51.65,13.396 h0.58 r270
R13: Mechanical 15 "1" at 50.281,13.093 h0.58 r90
R14: Mechanical 15 "1" at 48.232,13.093 h0.58 r90
R15: Mechanical 15 "1" at 46.183,13.093 h0.58 r90
U1: Mechanical 15 "1" at 33.107,11.722 h0.75 r90
U3: Mechanical 15 "1" at 17.611,14.443 h0.75 r90